# Altium PCB Zotino.PCBDOC (part 5 of 10)
Units mm, origin at the board's own origin, x right, y up, seen from the top; angles counter-clockwise.
Board outline 160.1 x 100.1 mm, 4 copper layers (TopLayer, Internal Plane 2, Signal Layer 1, BottomLayer), stack 1.563 mm thick; 759 components, 378 nets, 2272 pads, 779 vias.
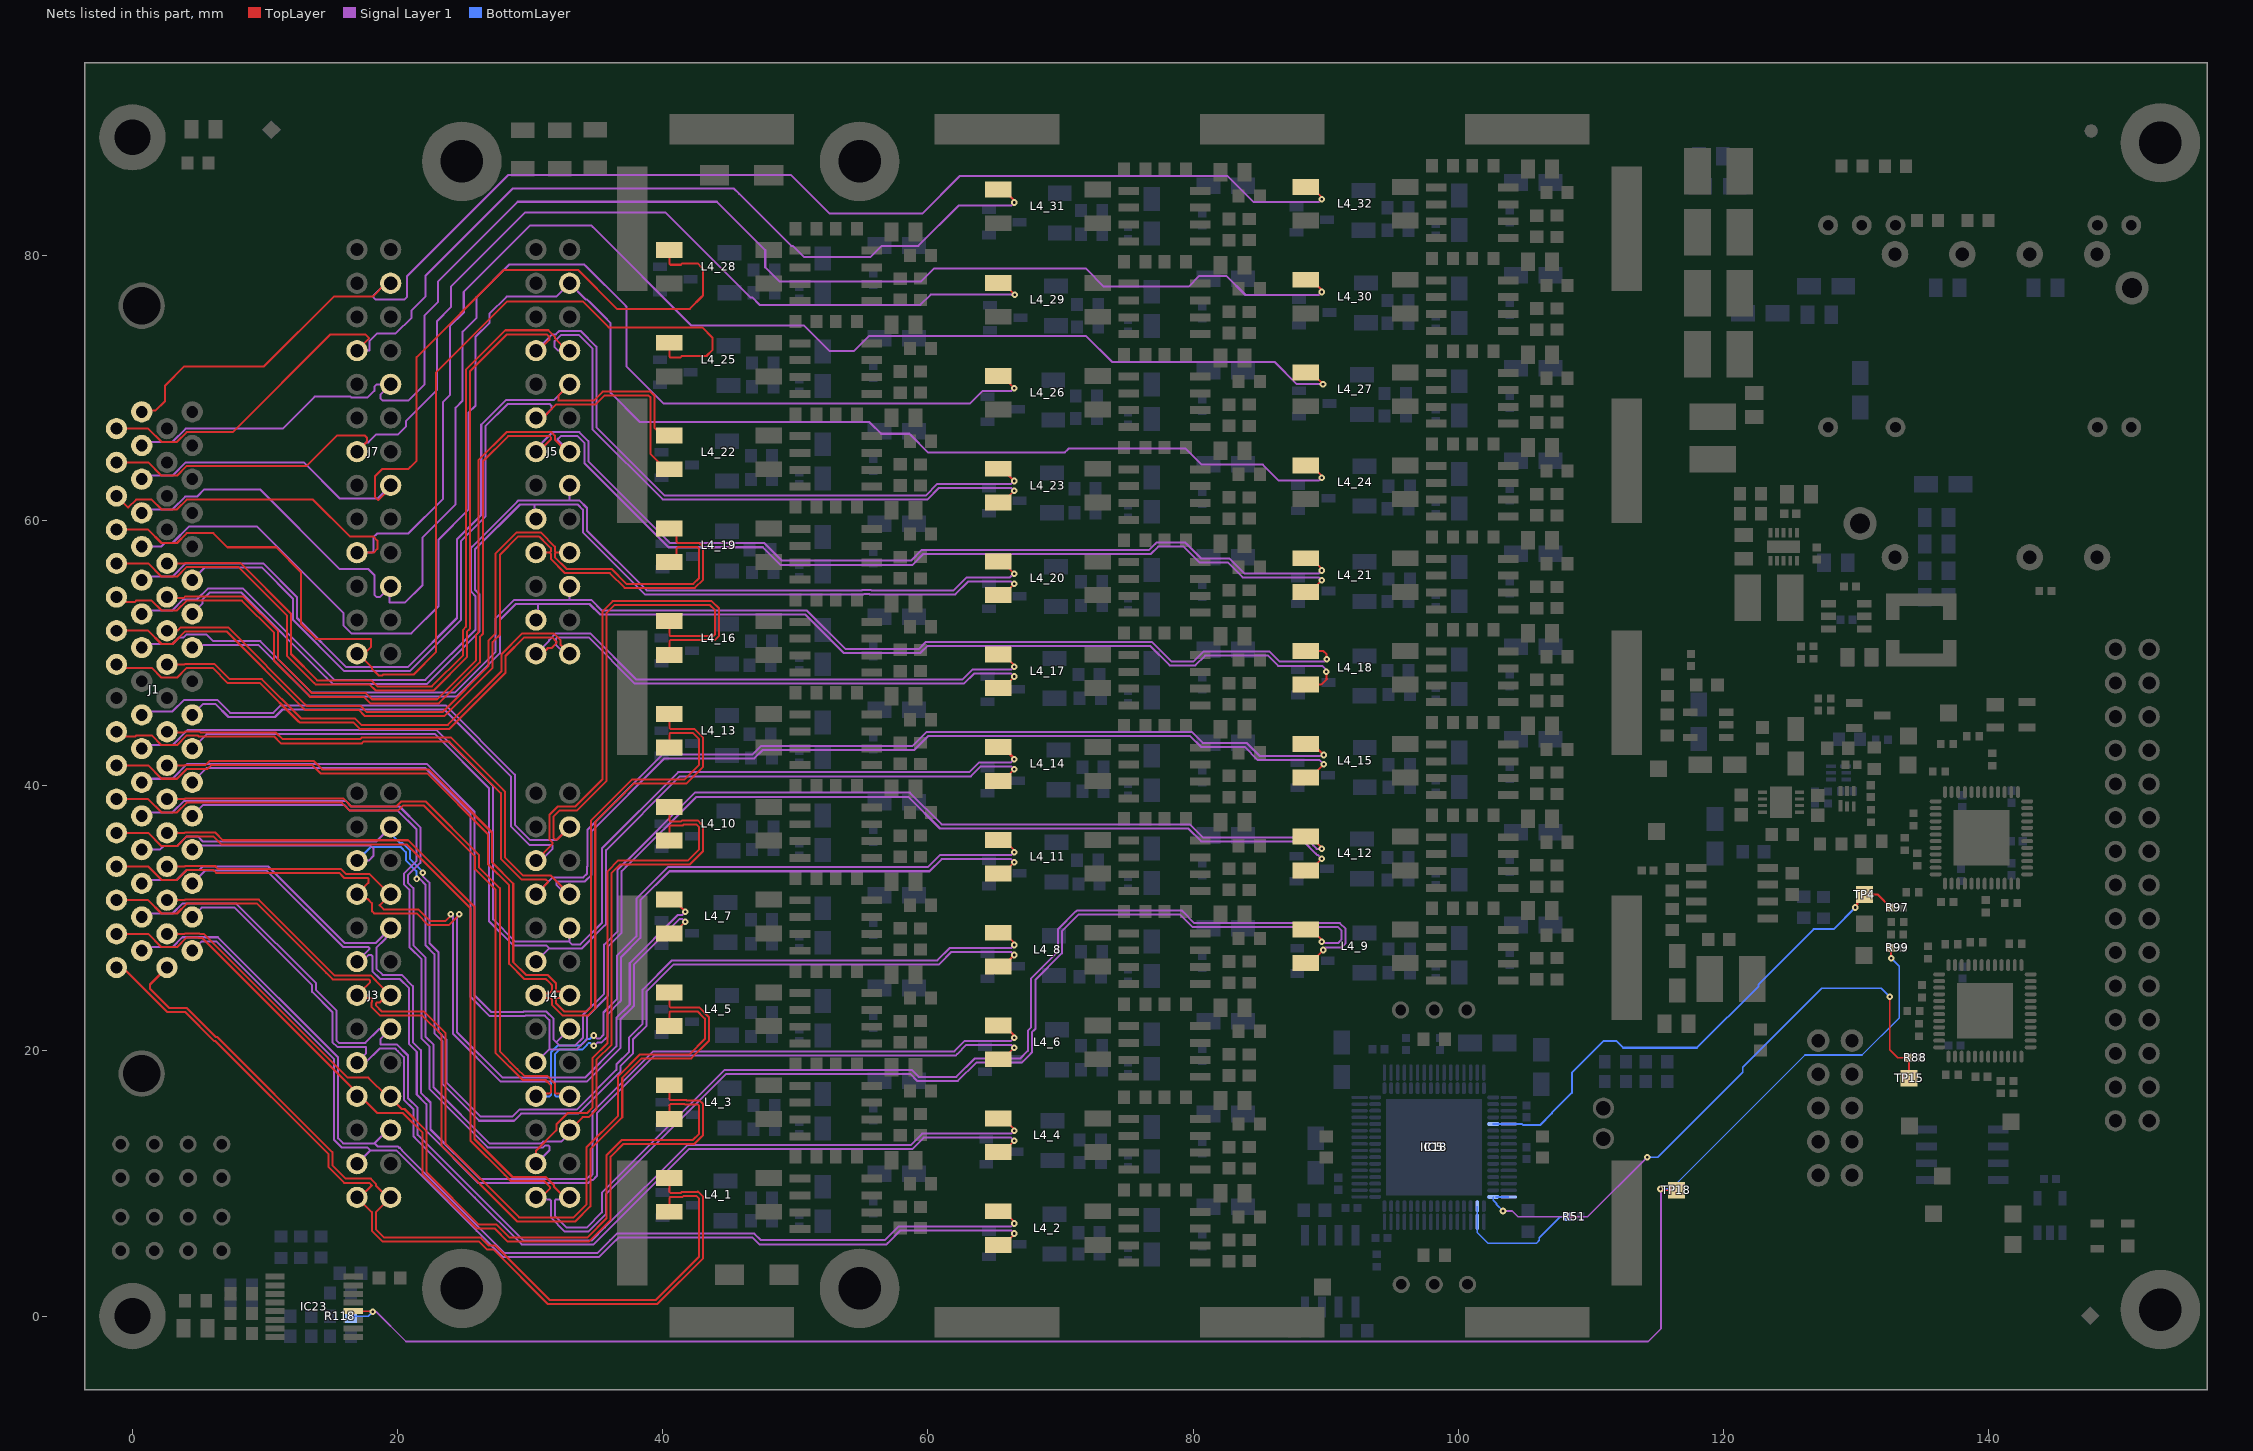
[diagram p5: the nets of this part, all layers, seen from the top]

## Via types
v1: diameter 0.5, hole 0.2, TopLayer to BottomLayer, tented both sides, 659 vias
v2: diameter 0.6, hole 0.3, TopLayer to BottomLayer, tented both sides, 56 vias
v3: diameter 1, hole 0.6, TopLayer to BottomLayer, tented both sides, 26 vias
v4: diameter 0.6, hole 0.3, TopLayer to BottomLayer, 18 vias
v5: diameter 1, hole 0.5, TopLayer to BottomLayer, tented both sides, 9 vias
v6: diameter 0.5, hole 0.2, TopLayer to BottomLayer, tented bottom, 7 vias
v7: diameter 0.5, hole 0.2, TopLayer to BottomLayer, 4 vias

## Nets (pads, with @x,y where several pads share a name; then routed paths per layer and width w, separated by ;. In a path a pad name is that pad's centre, name@x,y a point inside that pad or via, vN(x,y) a via of type N, cw(c..) or ccw(c..) an arc to the next point about the centre after c; other vN are vias at no path point) (continued)
DAC_OUT_N24: (continued)
  Signal Layer 1 w0.152: J1.60@0.704,58.039 2.177,58.039 2.444,58.306 3.025,58.306 4.279,59.56 9.368,59.56 15.933,52.995 15.933,52.079 16.521,51.491 21.035,51.491 23.085,53.54 23.085,58.557 25.345,60.818 25.345,68.121 25.879,68.654 25.879,73.849 26.92,74.891 26.92,75.587 28.224,76.891 31.973,76.891 J5.23@32.976,77.894 34.208,76.662 34.303,76.662 34.476,76.489 35.531,75.434 36.075,74.89 36.075,69.633 38.274,67.434 55.578,67.434 55.667,67.345 56.466,66.546 58.593,66.546 58.721,66.418 59.991,65.148 70.323,65.148 70.529,65.354 70.618,65.443 79.413,65.443 79.502,65.354 80.648,64.208 85.261,64.208 86.458,63.012 89.473,63.012 v1(89.695,63.235)
DAC_OUT_N25: J1.61 J7.2 L4_25.3 | length 85.6
  TopLayer w0.152: J1.61@-1.201,59.309 1.19,59.309 2.193,58.306 3.362,58.306 4.098,59.043 6.105,59.043 7.162,57.985 10.842,57.985 12.715,56.113 12.715,52.226 13.864,51.077 18.005,51.077 18.005,50.492 17.467,49.954 J7.2@16.936,49.954 17.051,49.954 18.054,48.951 18.054,48.825 18.489,48.39 18.578,48.301 18.831,48.301 18.92,48.39 21.208,48.39 22.911,50.093 22.911,71.175 28.266,76.53 33.969,76.53 35.926,74.574 42.971,74.574 43.74,73.805 43.74,72.846 43.3,72.407 42.553,72.407 42.547,72.401 41.42,72.401 41.311,72.291 40.579,72.291 40.49,72.381 L4_25.3@40.49,73.409
DAC_OUT_N26: J1.62 J7.5 L4_26.3 | length 102.3
  TopLayer w0.152: L4_26.3@65.29,70.909 65.571,70.909 v1(66.495,69.985)
  Signal Layer 1 w0.152: J1.62@0.704,60.579 0.971,60.846 3.025,60.846 3.974,61.795 4.873,61.795 5.432,62.354 9.622,62.354 15.642,56.334 16.387,56.334 16.395,56.342 17.793,56.342 18.244,55.891 18.244,54.392 18.398,54.238 18.68,54.238 J7.5@19.38,54.938 ; J7.5@19.476,55.034 J7.5@19.38,54.938 ; v1(66.495,69.985) 66.273,69.762 64.106,69.762 63.175,68.831 40.045,68.831 37.249,71.627 37.249,76.129 37.194,76.184 34.174,79.204 34.085,79.293 28.404,79.293 25.955,76.844 25.955,75.29 24.913,74.249 24.913,69.054 24.38,68.521 24.38,61.218 21.891,58.729 21.891,55.141 20.553,53.802 19.38,53.802 J7.5@19.38,54.938
DAC_OUT_N27: J1.63 J7.8 L4_27.3 | length 123.9
  TopLayer w0.152: J1.63@-1.201,61.849 -0.346,60.995 -0.299,60.995 0.288,61.583 1.457,61.583 2.193,60.846 3.362,60.846 4.098,61.583 13.618,61.583 16.395,58.806 18.149,58.806 18.473,58.482 18.473,57.858 18.189,57.574 J7.8@16.936,57.574 ; L4_27.3@88.49,71.159 88.605,71.044 89.052,71.044 89.789,70.307 v1(89.789,70.282)
  Signal Layer 1 w0.152: J7.8@16.936,57.574 18.058,57.574 18.168,57.685 18.168,58.734 18.455,59.021 20.818,59.021 23.415,61.618 23.415,68.921 23.948,69.454 23.948,74.649 24.99,75.69 24.99,77.244 29.984,82.238 34.625,82.238 34.715,82.149 42.164,74.699 50.662,74.699 52.578,72.783 54.419,72.783 55.547,73.911 71.932,73.911 73.885,71.958 86.147,71.958 87.823,70.282 v1(89.789,70.282)
DAC_OUT_N28: J1.64 J7.11 L4_28.3 | length 67.6
  TopLayer w0.152: J7.11@19.476,62.654 19.36,62.538 19.42,62.479 19.476,62.479 18.542,61.544 18.288,61.798 18.288,63.322 18.852,63.886 20.807,63.886 20.954,64.033 21.436,64.515 21.436,72.326 28.008,78.898 33.618,78.898 36.544,75.971 42.036,75.971 42.959,76.895 43.049,76.984 43.049,78.988 42.959,79.077 42.642,79.395 41.465,79.395 41.361,79.291 40.579,79.291 40.49,79.381 L4_28.3@40.49,80.409
  Signal Layer 1 w0.152: J1.64@0.704,63.119 0.971,63.386 3.025,63.386 4.025,64.386 12.924,64.386 15.659,61.651 17.352,61.651 17.369,61.668 18.49,61.668 J7.11@19.476,62.654
DAC_OUT_N29: J1.65 J7.14 L4_29.3 | length 88.1
  TopLayer w0.152: J1.65@-1.201,64.389 1.19,64.389 2.193,63.386 3.362,63.386 4.098,64.123 13.143,64.123 15.447,66.426 17.506,66.426 17.694,66.238 17.694,65.952 J7.14@16.936,65.194 ; L4_29.3@65.29,77.909 65.677,77.909 v1(66.548,77.038)
  Signal Layer 1 w0.152: J7.14@16.936,65.194 17.644,65.902 17.794,65.902 18.386,66.494 20.037,66.494 20.621,67.079 20.621,67.492 22.983,69.854 22.983,75.049 24.024,76.09 24.024,77.644 29.619,83.238 40.194,83.238 46.608,76.824 46.735,76.824 47.295,76.263 59.423,76.263 60.198,77.038 v1(66.548,77.038)
DAC_OUT_N30: J1.66 J7.17 L4_30.3 | length 110.4
  TopLayer w0.152: L4_30.3@88.49,78.159 88.922,78.159 89.695,77.386 v1(89.695,77.235)
  Signal Layer 1 w0.152: J1.66@0.704,65.659 0.971,65.926 3.025,65.926 4.025,66.926 11.324,66.926 13.737,69.339 16.453,69.339 16.521,69.271 17.727,69.271 18.244,69.788 18.244,70.088 18.43,70.274 J7.17@19.476,70.274 19.476,70.271 18.694,69.488 18.694,69.238 18.89,69.042 20.807,69.042 22.018,70.254 22.018,75.448 23.059,76.49 23.059,78.043 29.059,84.043 44.07,84.043 44.44,83.673 47.728,80.385 47.728,79.094 48.809,78.014 59.469,78.014 60.447,78.991 71.929,78.991 73.272,77.648 79.655,77.648 80.468,78.461 82.499,78.461 83.948,77.012 89.473,77.012 v1(89.695,77.235)
DAC_OUT_N31: J1.67 J7.20 L4_31.3 | length 86.1
  TopLayer w0.152: J1.67@-1.201,66.929 1.19,66.929 2.193,65.926 3.362,65.926 4.098,66.663 7.555,66.663 14.939,74.046 17.552,74.046 17.86,73.738 J7.20@16.936,72.814 ; L4_31.3@65.29,84.909 L4_31.3@65.294,84.909 ; L4_31.3@65.294,84.958 65.674,84.958 66.495,84.137 v1(66.495,83.985)
  Signal Layer 1 w0.152: J7.20@16.936,72.814 17.87,72.814 17.87,73.522 18.462,74.114 19.859,74.114 21.053,75.308 21.053,75.848 22.094,76.89 22.094,78.443 28.694,85.043 45.353,85.043 45.758,84.638 49.678,80.718 49.804,80.718 50.639,79.883 55.68,79.883 56.516,80.718 59.28,80.718 62.323,83.762 66.273,83.762 v1(66.495,83.985)
DAC_OUT_N32: J1.68 J7.23 L4_32.3 | length 106.6
  TopLayer w0.152: J1.68@0.704,68.199 0.792,68.288 1.733,68.288 2.457,69.012 2.457,70.177 3.905,71.625 9.927,71.625 15.193,76.891 18.114,76.891 19.118,77.894 J7.23@19.476,77.894 ; L4_32.3@88.49,85.159 88.907,85.159 89.695,84.371 v1(89.695,84.235)
  Signal Layer 1 w0.152: J7.23@19.476,77.894 19.1,77.894 18.194,76.988 18.194,76.812 18.343,76.662 20.502,76.662 20.726,76.887 20.726,78.44 28.329,86.043 49.687,86.043 52.578,83.152 59.554,83.152 62.381,85.979 82.594,85.979 84.561,84.012 89.473,84.012 v1(89.695,84.235)
DAC_OUT_P1: J1.1 J3.1 L4_1.4 | length 66.1
  TopLayer w0.152: J1.1@2.609,26.289 1.329,25.009 1.329,24.673 2.764,23.238 4.111,23.238 6.302,21.047 6.396,21.047 15.084,12.36 15.084,11.376 16.1,10.36 17.977,10.36 18.359,9.979 18.359,9.852 19.257,8.954 J3.1@19.476,8.954 18.359,7.837 18.359,6.55 18.994,5.915 26.278,5.915 26.859,5.334 27.348,5.334 31.466,1.216 39.468,1.216 42.744,4.493 42.744,8.862 42.554,9.052 41.553,9.052 41.489,8.987 40.579,8.987 40.49,8.897 L4_1.4@40.49,7.869
DAC_OUT_P2: J1.2 J3.4 L4_2.4 | length 80.1
  TopLayer w0.152: L4_2.4@65.29,5.369 65.694,5.369 66.495,6.17 v1(66.495,6.235)
  Signal Layer 1 w0.152: J1.2@4.514,27.559 5.222,28.267 6.321,28.267 15.211,19.377 15.211,13.282 15.77,12.723 17.71,12.723 17.935,12.498 ; J3.4@16.936,11.494 16.95,11.494 17.944,12.488 17.935,12.498 ; v1(66.495,6.235) 66.273,6.457 57.916,6.457 56.966,5.506 56.876,5.417 47.283,5.417 47.194,5.506 46.785,5.915 36.66,5.915 36.165,5.42 35.186,4.442 27.947,4.442 25.966,6.423 19.892,12.498 17.935,12.498
DAC_OUT_P3: J1.3 J3.7 L4_3.4 | length 62.8
  TopLayer w0.152: J1.3@2.609,28.829 3.934,28.829 3.972,28.867 5.056,28.867 5.094,28.829 5.378,28.829 16.227,17.98 17.801,17.98 J3.7@19.207,16.574 ; J3.7@19.476,16.574 19.476,16.465 20.32,15.621 20.523,15.621 22.098,14.046 22.187,13.957 22.187,10.832 26.124,6.896 27.47,6.896 28.448,5.918 34.29,5.918 35.771,7.399 35.771,12.148 36.907,13.284 42.263,13.284 42.744,13.765 42.744,15.862 42.656,15.95 41.681,15.95 41.644,15.987 40.579,15.987 40.49,15.897 L4_3.4@40.49,14.869
DAC_OUT_P4: J1.4 J3.10 L4_4.4 | length 85
  TopLayer w0.152: L4_4.4@65.29,12.369 65.63,12.369 v1(66.495,13.235)
  Signal Layer 1 w0.152: J1.4@4.514,30.099 5.222,30.807 7.718,30.807 13.56,24.965 13.56,24.458 15.084,22.934 15.084,20.668 15.451,20.301 17.632,20.301 17.632,19.81 J3.10@16.936,19.114 17.57,19.114 18.639,20.183 19.826,20.183 20.021,19.988 20.48,19.53 20.48,16.313 21.211,15.581 21.211,13.549 21.301,13.46 25.835,8.926 29.353,5.407 34.787,5.407 35.765,6.386 41.975,12.596 58.82,12.596 59.682,13.457 66.273,13.457 v1(66.495,13.235)
DAC_OUT_P5: J1.5 J3.13 L4_5.4 | length 73.1
  TopLayer w0.152: J1.5@2.609,31.369 3.934,31.369 3.972,31.407 9.531,31.407 9.75,31.188 15.233,25.705 17.964,25.705 18.359,25.311 18.359,25.285 19.449,24.194 J3.13@19.476,24.194 19.207,24.194 18.663,23.651 18.444,23.651 18.354,23.562 18.354,23.435 18.827,22.962 21.995,22.962 22.085,22.872 23.622,21.335 23.622,12.987 29.167,7.442 33.274,7.442 34.239,8.407 34.239,12.714 36.639,15.114 36.639,18.096 38.282,19.739 42.023,19.739 43.18,20.896 43.18,22.426 43.013,22.593 42.619,22.987 40.579,22.987 40.49,22.897 L4_5.4@40.49,21.869
DAC_OUT_P6: J1.6 J3.16 L4_6.4 | length 89.5
  TopLayer w0.152: L4_6.4@65.29,19.369 65.63,19.369 v1(66.495,20.235)
  Signal Layer 1 w0.152: J1.6@4.514,32.639 5.476,33.601 10.131,33.601 15.896,27.836 17.801,27.836 17.878,27.759 17.878,27.675 J3.16@16.936,26.734 17.328,26.734 17.841,27.247 18.006,27.247 18.095,27.158 18.095,26.022 18.691,25.426 20.177,25.426 20.849,24.754 20.849,20.525 21.445,19.93 21.445,16.713 22.177,15.981 22.177,13.949 22.266,13.86 26.087,10.039 34.384,10.039 34.604,10.259 34.717,10.259 35.023,10.564 35.023,15.295 39.396,19.669 62.111,19.669 62.201,19.758 62.899,20.457 66.273,20.457 v1(66.495,20.235)
DAC_OUT_P7: J1.7 J3.19 L4_7.4 | length 63.6
  TopLayer w0.152: J1.7@2.609,33.909 3.934,33.909 3.972,33.947 6.229,33.947 6.448,33.728 15.719,33.728 16.1,33.347 17.878,33.347 19.411,31.814 J3.19@19.476,31.814 18.65,30.988 18.65,30.974 18.944,30.68 21.561,30.68 22.45,29.791 23.593,29.791 24.003,30.202 v1(24.003,30.299) ; L4_7.4@40.041,28.869 L4_7.4@40.49,28.869 40.83,28.869 v1(41.695,29.735)
  Signal Layer 1 w0.152: v1(24.003,30.299) 24.177,30.126 24.177,21.293 27.794,17.676 34.26,17.676 35.835,19.251 36.801,20.216 36.801,22.372 37.725,23.296 37.814,23.385 37.814,26.496 41.275,29.957 41.473,29.957 v1(41.695,29.735)
  BottomLayer w0.152: v1@24.003,30.175 v1(24.003,30.299)
DAC_OUT_P8: J1.8 J3.22 L4_8.4 | length 92.4
  TopLayer w0.152: L4_8.4@65.29,26.369 65.63,26.369 v1(66.495,27.235)
  Signal Layer 1 w0.152: J1.8@4.514,35.179 4.823,35.488 17.944,35.488 18.194,35.238 18.194,34.738 17.81,34.354 J3.22@16.936,34.354 ; v1(21.438,32.97) 21.683,32.97 22.107,32.547 22.107,27.975 22.78,27.302 22.78,21.325 23.375,20.729 23.375,17.513 26.154,14.734 28.783,14.734 29.316,15.266 33.629,15.266 36.801,18.438 36.801,18.851 37.766,19.817 37.766,20.9 38.779,21.914 38.779,24.486 40.82,26.527 60.841,26.527 60.931,26.616 61.771,27.457 66.273,27.457 v1(66.495,27.235)
  BottomLayer w0.152: J3.22@16.936,34.354 17.961,35.379 20.24,35.379 20.621,34.998 20.621,34.364 21.42,33.565 21.42,32.988 v1(21.438,32.97)
DAC_OUT_P9: J1.9 J4.1 L4_9.4 | length 135.1
  TopLayer w0.152: J1.9@2.609,36.449 3.934,36.449 3.972,36.487 6.229,36.487 6.267,36.449 6.829,35.887 20.798,35.887 25.802,30.883 25.802,13.358 28.669,10.491 31.177,10.491 31.796,9.873 31.796,9.747 32.588,8.954 J4.1@32.976,8.954 ; L4_9.4@88.49,26.619 88.83,26.619 v1(89.818,27.608)
  Signal Layer 1 w0.152: J4.1@32.976,8.954 32.824,8.801 31.948,8.801 31.859,8.712 31.859,7.566 32.748,6.677 34.261,6.677 35.404,7.82 35.404,9.307 44.666,18.569 55.176,18.569 55.184,18.561 55.56,18.561 55.568,18.569 58.776,18.569 59.302,18.043 62.136,18.043 63.521,19.428 66.95,19.428 67.535,20.012 67.535,21.536 67.789,21.79 67.789,25.473 69.799,27.484 69.799,29.158 71.158,30.518 71.248,30.607 79.12,30.607 79.21,30.518 80.087,29.641 91.058,29.641 91.499,29.2 91.499,28.112 91.194,27.807 90.018,27.807 v1(89.818,27.608)
DAC_OUT_P10: J1.10 J4.4 L4_10.4 | length 89.3
  TopLayer w0.152: J4.4@30.436,11.494 30.436,12.479 31.973,14.015 31.973,14.45 32.84,15.316 34.29,15.316 34.691,15.718 34.691,19.451 35.835,20.595 35.835,33.549 36.653,34.366 41.91,34.366 42.744,35.2 42.744,36.862 42.516,37.09 41.591,37.09 41.488,36.987 40.579,36.987 40.49,36.897 L4_10.4@40.49,35.869
  Signal Layer 1 w0.152: J1.10@4.514,37.719 5.349,38.554 15.967,38.554 16.395,38.126 20.018,38.126 21.41,36.735 21.41,34.308 20.472,33.37 20.472,32.571 20.887,32.156 20.887,27.83 20.976,27.741 21.815,26.902 21.815,20.925 22.41,20.33 22.41,17.113 26.796,12.726 30.978,12.726 31.101,12.85 31.39,12.85 31.467,12.773 31.467,12.524 J4.4@30.436,11.494
DAC_OUT_P11: J1.11 J4.7 L4_11.4 | length 99.5
  TopLayer w0.152: J1.11@2.609,38.989 3.934,38.989 3.972,39.027 15.925,39.027 16.521,38.431 19.892,38.431 20.269,38.808 22.119,38.808 26.158,34.769 26.158,33.817 27.707,32.268 27.707,19.962 29.04,18.629 29.558,18.111 31.283,18.111 31.859,17.535 31.859,16.864 31.948,16.775 32.776,16.775 J4.7@32.976,16.574 ; L4_11.4@65.29,33.369 65.63,33.369 v1(66.495,34.235)
  Signal Layer 1 w0.152: v1(34.798,20.396) 34.832,20.396 35.061,20.625 35.372,20.625 35.835,21.088 35.835,22.772 36.76,23.696 36.849,23.785 36.849,27.055 38.316,28.522 38.316,31.357 40.509,33.551 60.118,33.551 61.024,34.457 66.273,34.457 v1(66.495,34.235)
  BottomLayer w0.152: J4.7@32.976,16.574 31.948,16.574 31.859,16.664 31.859,19.752 32.224,20.118 33.95,20.118 34.303,20.47 34.303,20.488 34.409,20.594 34.535,20.594 34.733,20.396 v1(34.798,20.396)
DAC_OUT_P12: J1.12 J4.10 L4_12.4 | length 122.6
  TopLayer w0.152: L4_12.4@88.49,33.619 88.83,33.619 v1(89.695,34.485)
  Signal Layer 1 w0.152: J1.12@4.514,40.259 5.603,41.348 22.069,41.348 25.498,37.919 25.498,24.077 26.946,22.629 29.606,22.629 29.635,22.658 31.106,22.658 31.44,22.324 31.44,20.118 ; J4.10@30.436,19.114 31.44,20.118 ; v1(89.695,34.485) 89.398,34.782 89.341,34.782 89.252,34.871 88.324,35.799 80.609,35.799 79.632,36.776 60.906,36.776 58.515,39.167 42.543,39.167 37.48,34.103 37.434,34.057 37.404,34.057 36.902,33.555 36.902,28.904 35.884,27.885 35.884,24.185 35.794,24.096 34.29,22.591 34.29,20.88 33.527,20.118 31.44,20.118
DAC_OUT_P13: J1.13 J4.13 L4_13.4 | length 76.9
  TopLayer w0.152: J1.13@2.609,41.529 3.934,41.529 3.972,41.567 5.524,41.567 5.813,41.856 13.694,41.856 14.312,41.238 22.356,41.238 27.123,36.471 27.123,34.217 28.723,32.617 28.723,26.693 29.689,25.727 31.312,25.727 31.945,25.095 31.945,24.518 31.992,24.471 32.699,24.471 J4.13@32.976,24.194 32.764,23.982 31.945,23.982 31.945,23.594 32.553,22.985 34.253,22.985 34.602,23.334 34.602,37.395 37.669,40.462 41.633,40.462 42.744,41.573 42.744,43.5 42.257,43.987 40.579,43.987 40.49,43.897 L4_13.4@40.49,42.869
DAC_OUT_P14: J1.14 J4.16 L4_14.4 | length 87
  TopLayer w0.152: L4_14.4@65.29,40.369 65.63,40.369 v1(66.495,41.235)
  Signal Layer 1 w0.152: J1.14@4.514,42.799 5.603,43.888 22.831,43.888 26.895,39.824 26.895,29.792 28.724,27.963 31.22,27.963 31.444,27.738 ; J4.16@30.436,26.734 30.44,26.734 31.443,27.738 ; v1(66.495,41.235) 66.273,41.457 63.979,41.457 63.235,40.713 41.291,40.713 35.721,35.144 35.721,29.551 35.632,29.462 33.908,27.738 31.443,27.738
DAC_OUT_P15: J1.15 J4.19 L4_15.4 | length 108.2
  TopLayer w0.152: J1.15@2.609,44.069 2.663,44.015 3.88,44.015 3.972,44.107 5.056,44.107 5.148,44.015 10.817,44.015 11.325,43.507 17.174,43.507 17.293,43.626 24.032,43.626 24.109,43.549 27.999,39.659 28.088,39.57 28.088,34.617 29.485,33.22 31.57,33.22 J4.19@32.553,32.238 ; 31.771,33.019 J4.19@32.553,32.238 ; J4.19@32.976,31.814 J4.19@32.553,32.238 ; L4_15.4@88.49,40.619 88.856,40.619 v1(89.857,41.619)
  Signal Layer 1 w0.152: J4.19@32.976,31.814 32.679,31.814 31.975,32.519 31.975,32.789 34.133,32.789 34.642,33.297 34.642,36.573 40.128,42.06 46.91,42.06 47.545,42.695 58.975,42.695 60.042,43.761 79.757,43.761 80.591,42.927 83.895,42.927 84.887,41.935 89.541,41.935 v1(89.857,41.619)
DAC_OUT_P16: J1.16 J4.22 L4_16.4 | length 74.7
  TopLayer w0.152: J4.22@30.436,34.354 31.68,35.598 31.68,35.724 31.445,35.959 31.445,37.794 32.082,38.431 33.392,38.431 35.466,40.505 35.466,53.162 36.228,53.924 43.688,53.924 44.247,53.365 44.247,51.303 43.93,50.987 40.579,50.987 40.49,50.897 L4_16.4@40.49,49.869
  Signal Layer 1 w0.152: J1.16@4.514,45.339 5.349,46.174 6.258,46.174 7.249,45.183 10.753,45.183 11.32,45.751 23.508,45.751 28.546,40.713 28.546,36.936 29.944,35.537 31.645,35.537 31.694,35.488 31.694,35.238 30.81,34.354 J4.22@30.436,34.354
DAC_OUT_P17: J1.19 J5.1 L4_17.4 | length 76.5
  TopLayer w0.152: J1.19@2.609,49.149 3.934,49.149 3.972,49.187 6.185,49.187 7.329,48.043 9.755,48.043 12.652,45.146 12.741,45.057 16.805,45.057 17.27,44.592 23.787,44.592 27.834,48.639 27.834,49.908 29.417,51.491 31.788,51.491 32.279,51 32.279,50.652 J5.1@32.976,49.954 ; L4_17.4@65.29,47.369 65.63,47.369 v1(66.495,48.235)
  Signal Layer 1 w0.152: J5.1@32.976,49.954 32.631,49.954 31.944,50.641 31.944,51.072 32.058,51.186 34.405,51.186 37.893,47.698 62.712,47.698 63.471,48.457 66.273,48.457 v1(66.495,48.235)
DAC_OUT_P18: J1.20 J5.4 L4_18.4 | length 98.4
  TopLayer w0.152: L4_18.4@88.49,47.619 89.656,47.619 90.068,48.031 90.044,48.056 v1(90.044,48.588)
  Signal Layer 1 w0.152: J1.20@4.514,50.419 4.714,50.619 9.496,50.619 12.848,47.267 13.399,46.716 24.438,46.716 24.989,47.267 27.707,49.985 27.707,52.502 28.912,53.706 30.596,53.706 ; J5.4@30.436,52.494 30.596,52.654 30.596,53.706 ; v1(90.044,48.588) 90.044,48.732 89.729,49.047 86.411,49.047 85.649,49.809 80.898,49.809 80.169,49.08 78.236,49.08 76.785,50.531 59.953,50.531 59.507,50.085 59.418,49.996 53.661,49.996 53.572,50.085 50.746,52.911 35.271,52.911 34.476,53.706 30.596,53.706
DAC_OUT_P19: J1.21 J5.7 L4_19.4 | length 61.8
  TopLayer w0.152: J1.21@2.609,51.689 3.401,51.689 3.651,51.94 7.223,51.94 13.052,46.111 13.141,46.022 17.205,46.022 17.67,45.557 23.387,45.557 26.869,49.039 26.869,50.962 26.996,51.089 27.403,51.495 27.403,57.527 28.986,59.111 30.43,59.111 ccw(c30.436,60.114) 30.442,59.111 30.785,59.111 31.859,58.038 31.859,57.664 31.948,57.574 ; J5.7@32.976,57.574 31.948,57.574 ; L4_19.4@40.49,56.869 40.525,56.869 41.049,57.393 41.049,57.897 41.138,57.987 42.619,57.987 42.744,57.862 42.744,55.667 42.3,55.223 37.259,55.223 36.14,56.342 32.754,56.342 31.859,57.237 31.859,57.485 31.948,57.574
DAC_OUT_P20: J1.22 J5.10 L4_20.4 | length 82.6
  TopLayer w0.152: L4_20.4@65.29,54.369 65.63,54.369 v1(66.495,55.235)
  Signal Layer 1 w0.152: J1.22@4.514,52.959 5.305,53.75 5.305,54.048 5.813,54.556 8.226,54.556 14.626,48.156 15.101,47.681 22.228,47.681 22.703,48.156 26.094,51.547 26.183,51.636 26.183,54.429 26.094,54.518 25.84,54.772 25.84,57.82 29.232,61.212 30.324,61.212 ; J5.10@30.436,60.114 30.324,60.001 30.324,61.212 ; v1(66.495,55.235) 66.408,55.235 66.232,55.41 66.106,55.41 66.099,55.403 63.036,55.403 62.062,54.429 55.598,54.429 55.56,54.467 55.184,54.467 55.146,54.429 38.655,54.429 33.98,59.105 33.98,59.699 33.98,60.818 33.586,61.212 33.04,61.212 30.324,61.212
DAC_OUT_P21: J1.23 J5.13 L4_21.4 | length 119.9
  TopLayer w0.152: J1.23@2.609,54.229 2.663,54.175 3.88,54.175 3.972,54.267 8.375,54.267 10.994,51.648 10.994,49.534 13.451,47.076 13.541,46.987 17.605,46.987 18.07,46.522 22.987,46.522 25.904,49.439 25.904,51.362 26.031,51.489 26.12,51.578 26.12,64.577 28.215,66.672 31.593,66.672 31.682,66.583 31.859,66.406 31.859,66.113 32.778,65.194 J5.13@32.976,65.194 ; L4_21.4@88.49,54.619 88.83,54.619 v1(89.695,55.485)
  Signal Layer 1 w0.152: J5.13@32.976,65.194 32.057,66.113 32.311,66.367 33.575,66.367 34.083,65.859 34.083,64.336 34.172,64.247 40.433,57.985 47.545,57.985 48.866,56.665 58.848,56.665 59.661,57.477 76.814,57.477 77.364,58.027 79.282,58.027 80.466,56.842 82.597,56.842 83.733,55.707 89.473,55.707 v1(89.695,55.485)
DAC_OUT_P22: J1.24 J5.16 L4_22.4 | length 64.8
  TopLayer w0.152: J5.16@30.436,67.734 30.94,67.734 31.943,68.738 34.911,68.738 35.596,69.423 38.941,69.423 39.06,69.304 39.06,65.022 40.213,63.869 L4_22.4@40.49,63.869
  Signal Layer 1 w0.152: J1.24@4.514,55.499 5.476,56.461 9.75,56.461 12.112,54.099 12.112,52.525 15.99,48.646 20.908,48.646 24.786,52.525 24.786,58.463 26.615,60.292 26.615,67.104 28.292,68.78 31.482,68.78 31.594,68.669 31.594,68.388 30.94,67.734 J5.16@30.436,67.734
DAC_OUT_P23: J1.25 J5.19 L4_23.4 | length 107.6
  TopLayer w0.152: J1.25@2.609,56.769 3.934,56.769 3.972,56.807 8.125,56.807 11.959,52.973 11.959,49.934 13.941,47.952 18.004,47.952 18.47,47.487 22.587,47.487 24.939,49.839 24.939,51.762 25.155,51.978 25.155,71.38 28.126,74.351 31.367,74.351 31.859,73.86 31.859,73.733 32.778,72.814 J5.19@32.976,72.814 ; L4_23.4@65.29,61.369 65.63,61.369 v1(66.495,62.235)
  Signal Layer 1 w0.152: J5.19@32.976,72.814 32.118,72.814 31.848,73.085 31.848,73.523 32.312,73.988 33.694,73.988 34.694,72.988 34.694,66.9 39.925,61.668 40.015,61.579 59.954,61.579 60.832,62.457 66.273,62.457 v1(66.495,62.235)